# Altium PCB Layout.PcbDoc (part 1 of 2)
Units mm, origin at the board's own origin, x right, y up, seen from the top; angles counter-clockwise.
Board outline 72.5 x 55.5 mm, 4 copper layers (Top Layer, Ground Layer, Power Layer, Bottom Layer), stack 1.591 mm thick; 77 components, 40 nets, 247 pads, 203 vias.
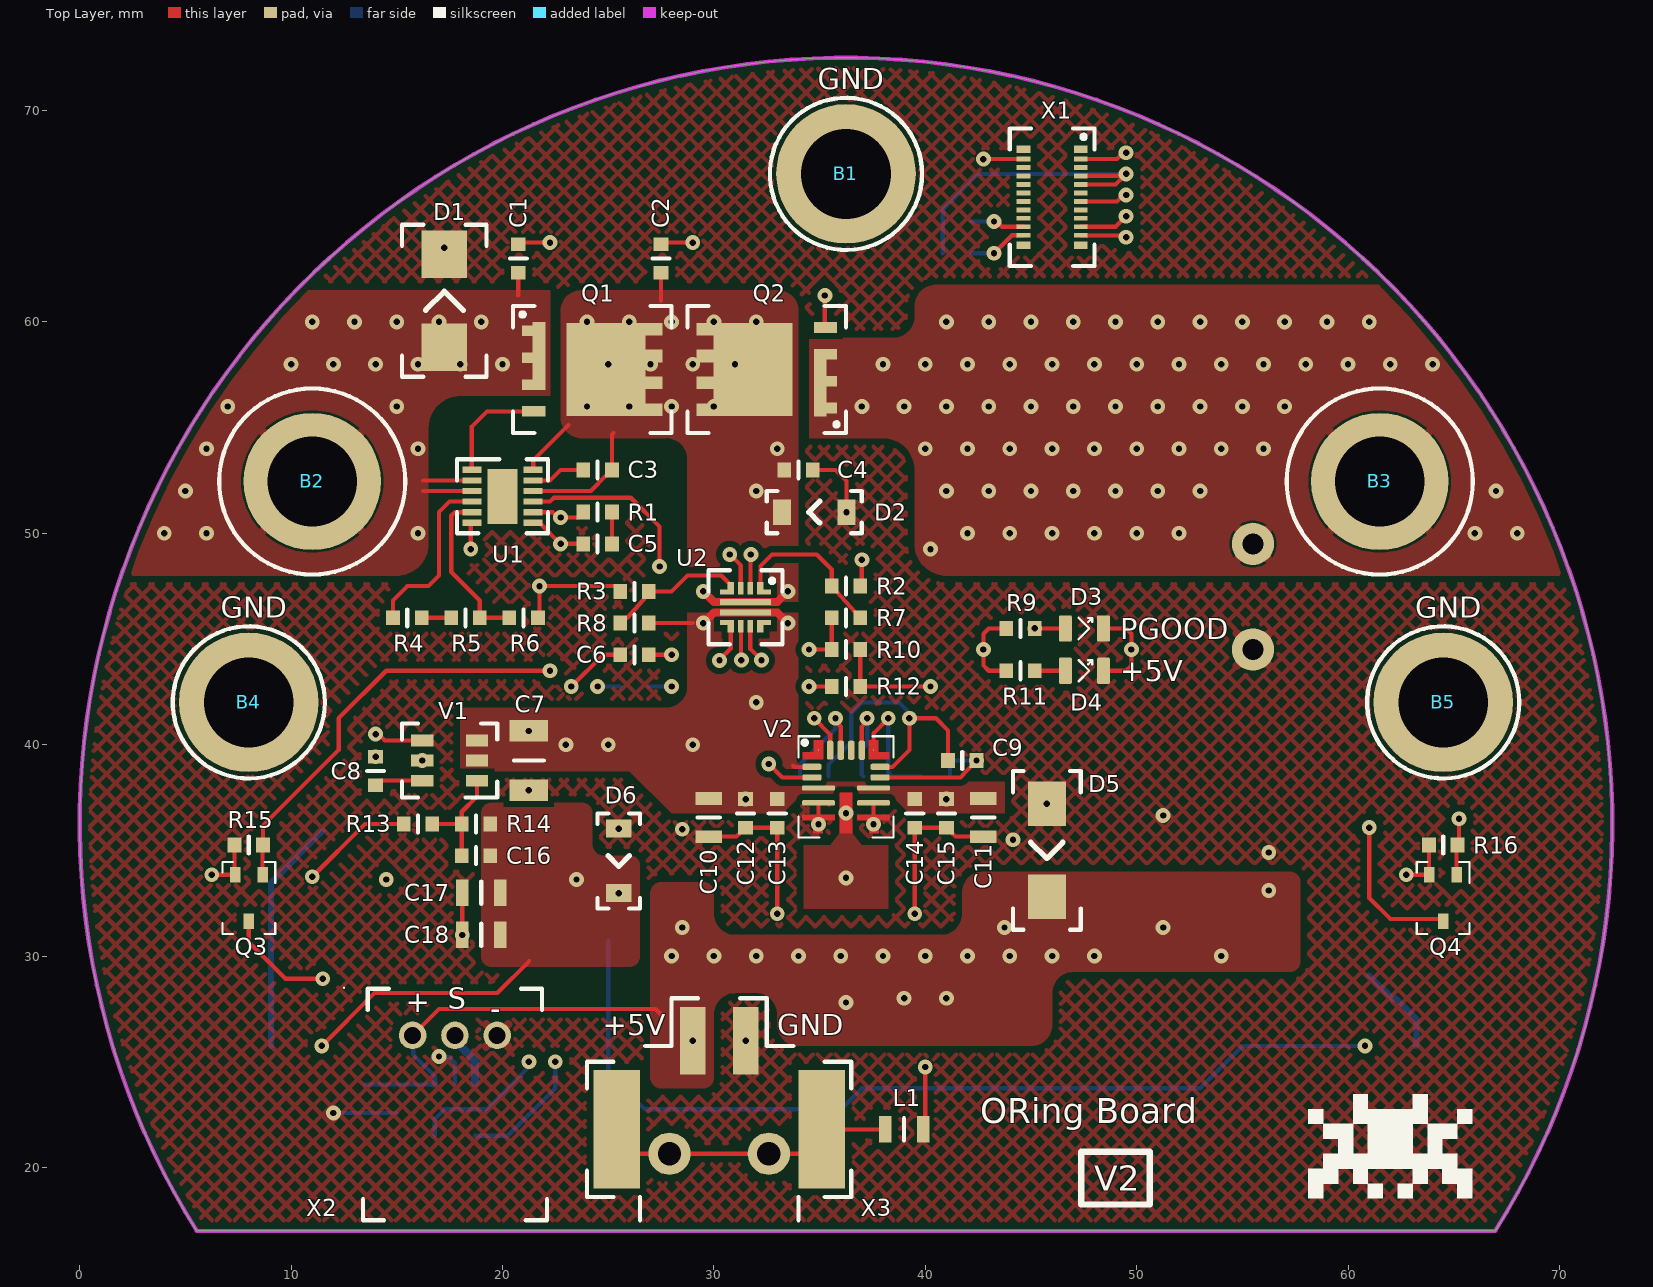
[diagram p0: Top Layer view]
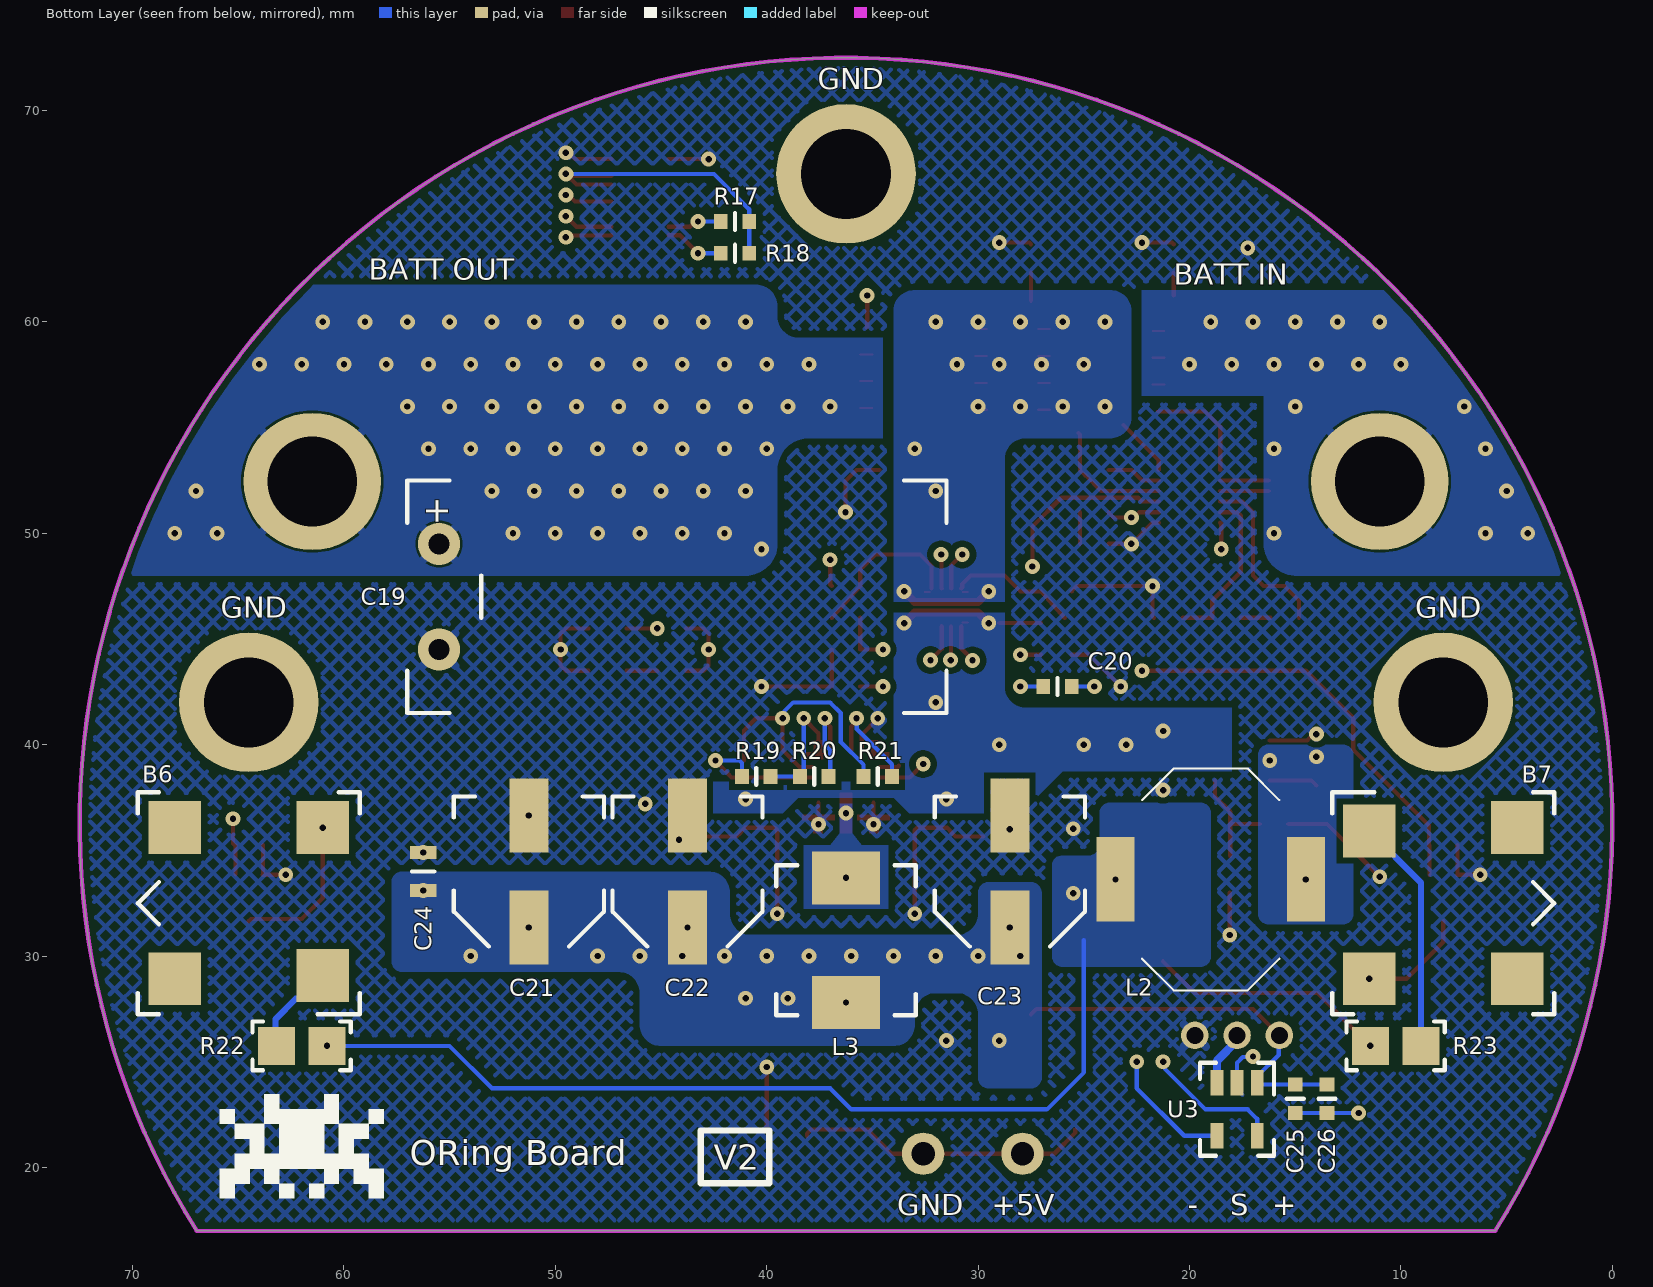
[diagram p1: Bottom Layer view, seen from below]
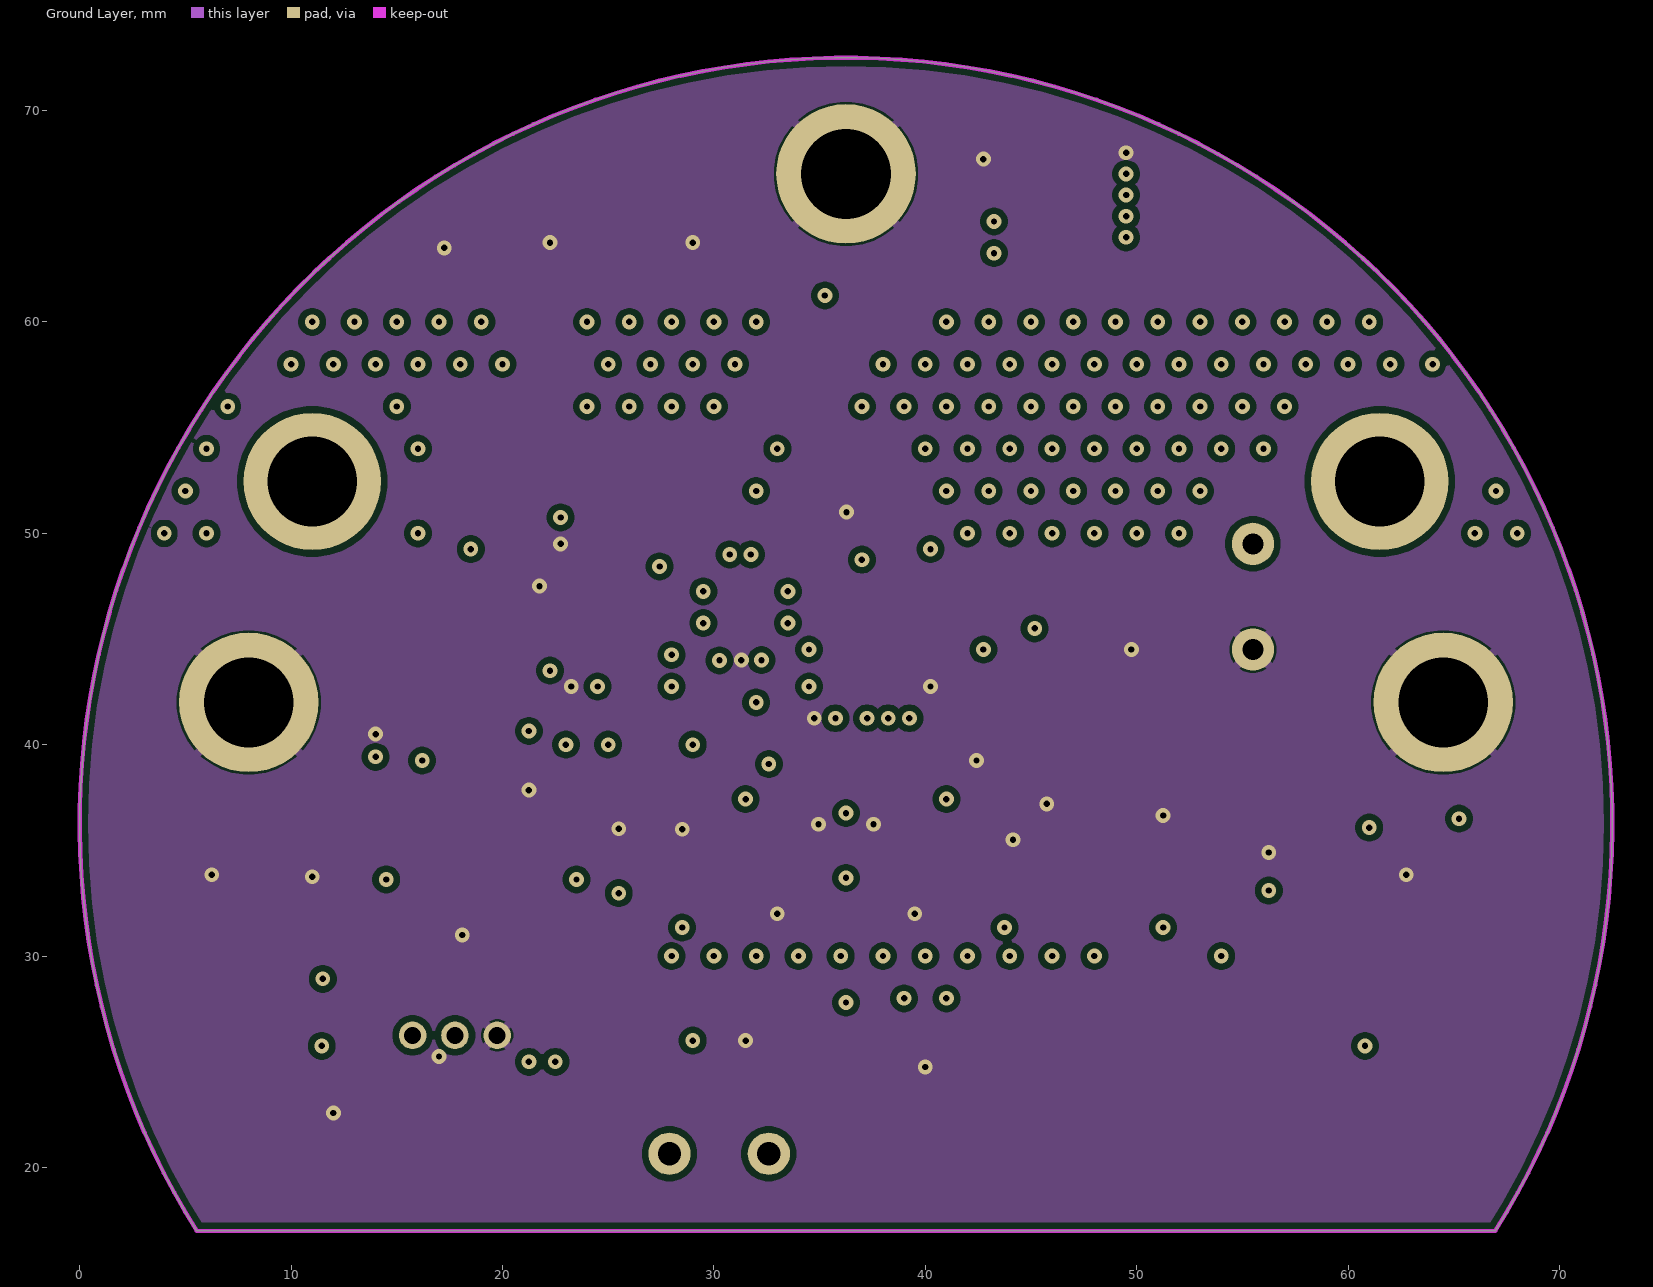
[diagram p2: Ground Layer]
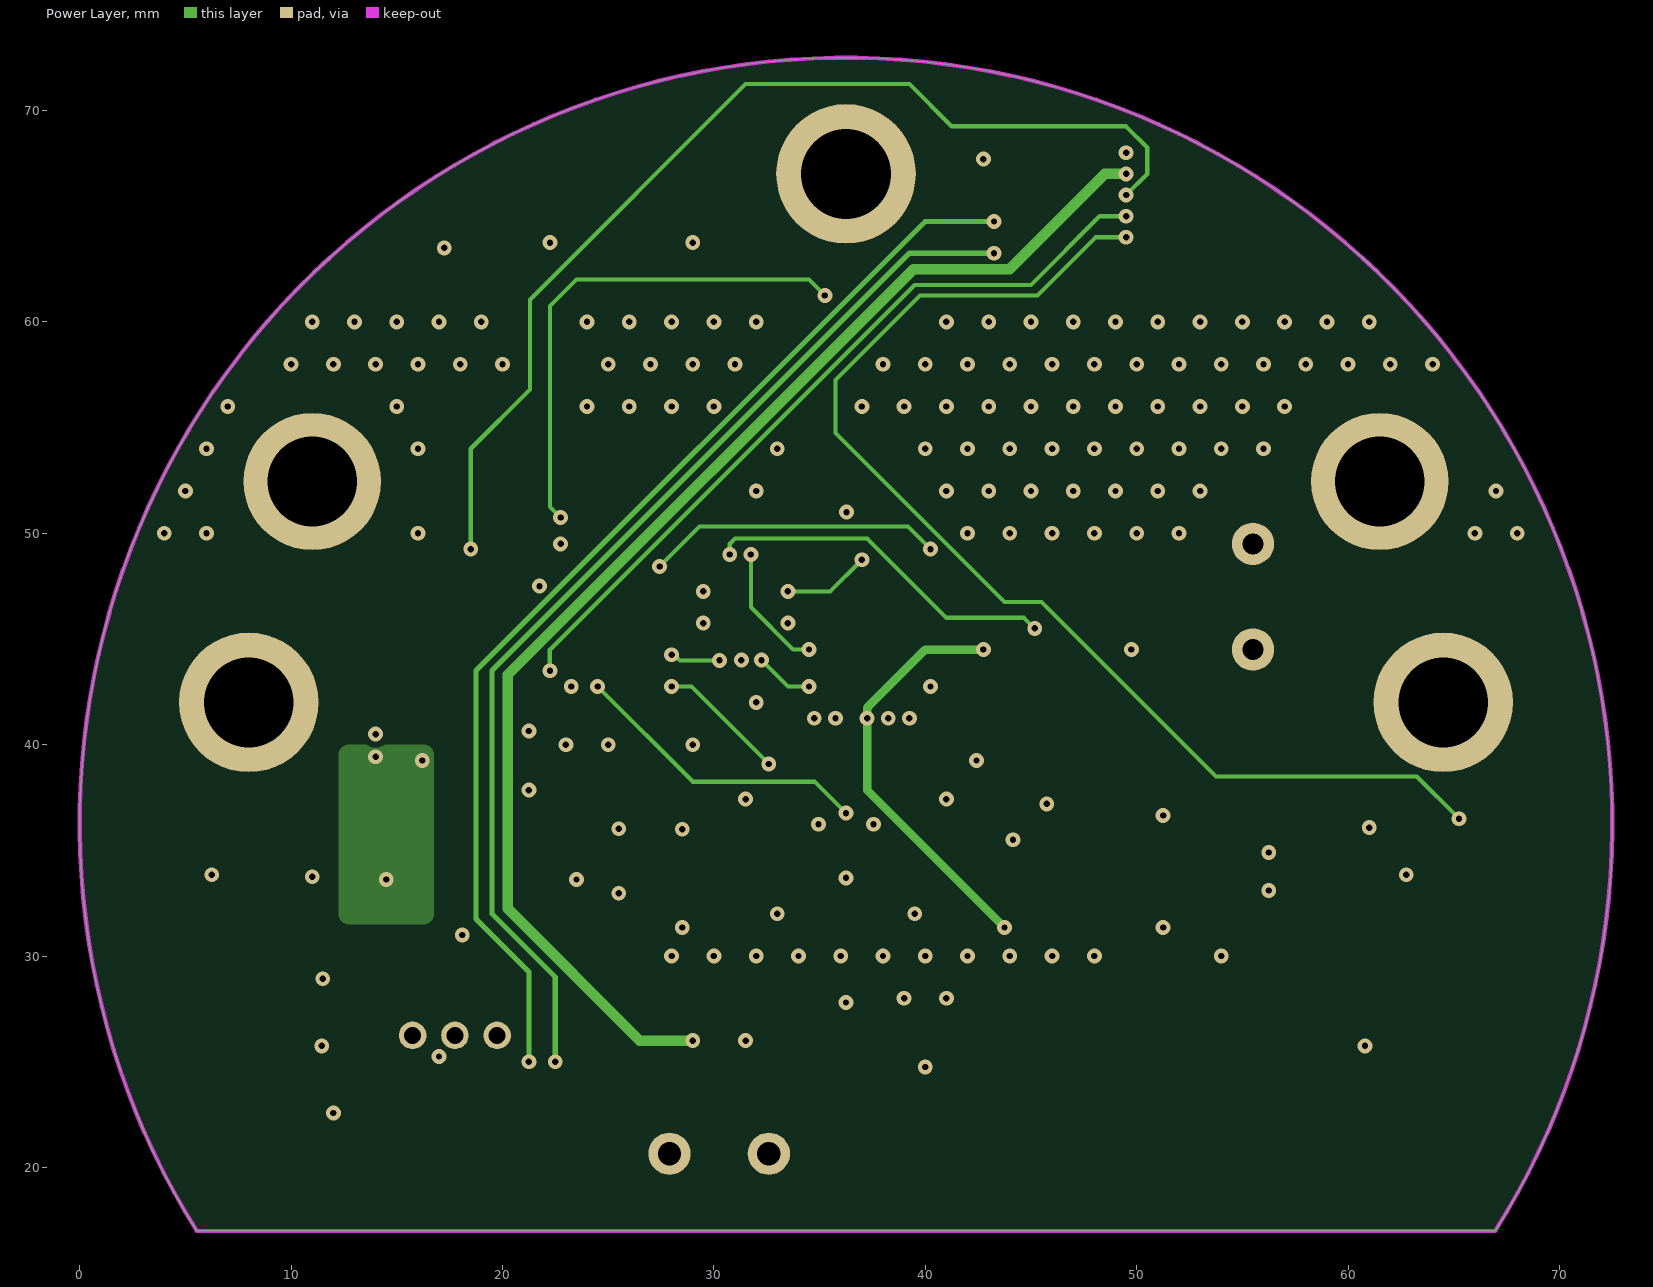
[diagram p3: Power Layer]

## Layer stack, top to bottom
Top Solder: solder mask 0.0102, Solder Resist, Dk 3.8
Top Layer: signal copper 0.035
Dielectric 2: prepreg 0.2104, 7628*1, Dk 4.4
Ground Layer: signal copper 0.0175
Dielectric 1: dielectric 1.065, FR-4, Dk 4.8
Power Layer: signal copper 0.0175
Dielectric 3: prepreg 0.2104, 7628*1, Dk 4.4
Bottom Layer: signal copper 0.035
Bottom Solder: solder mask 0.0102, Solder Resist, Dk 3.8

## Board outline
5.534,17 cw(c36.25,36.25) 66.966,17

## Design rules (kind name [scope] priority, off if disabled: settings)
BoardOutlineClearance [All] p1: gap=0.2 ignorepadtopadclearanceinfootprint=FALSE
Clearance "inPolygon Clearance" [InPolygon] p1: gap=0.3 ignorepadtopadclearanceinfootprint=TRUE // this rule ensures that every net within a polygon of a different net has a set clearance from the poly
Clearance "High Current Polygon Clearance" [(InPolygon AND InNetClass('High_Current_Nets'))] p2: gap=0 ignorepadtopadclearanceinfootprint=TRUE // this rule ensures that every net within a polygon of a different net has a set clearance from the poly
Clearance "Different Diff Pair" [All] p3: gap=0.2 ignorepadtopadclearanceinfootprint=TRUE
Clearance "Same Diff Pair" [All] p4: gap=0.1 ignorepadtopadclearanceinfootprint=TRUE
Clearance "Different Nets" [not InAnyDifferentialPair] p5: gap=0.3 ignorepadtopadclearanceinfootprint=TRUE except(0.1: Arc-SMDPad Arc-THPad Arc-Via Arc-Text Track-SMDPad Track-THPad Track-Via Track-Text SMDPad-Text THPad-Text Via-Text Fill-Text Poly-Text Region-Text Text-Text; 0.12: Arc-Arc Arc-Track Track-Track; 0.15: SMDPad-SMDPad SMDPad-THPad SMDPad-Via THPad-THPad THPad-Via Via-Via; 0.2: Arc-Hole Track-Hole SMDPad-Hole THPad-Hole Via-Hole Fill-Hole Poly-Hole Region-Hole Text-Hole)
Clearance "Same Net" [not InAnyDifferentialPair] p6: gap=0 ignorepadtopadclearanceinfootprint=TRUE except(0.1: THPad-Via; 0.18: Arc-Arc Arc-Track Track-Track)
ComponentClearance [All] p1: gap=0.102 collisioncheckmode=3 verticalgap=0.102 showdistances=TRUE
DiffPairsRouting "Ethernet Routing" [InDifferentialPairClass('Ethernet_Pairs')] p1: maxlimit=0.25 minlimit=0.2 mostfreqgap=0.25 toplayer_maxgap=0.2 toplayer_prefgap=0.2 toplayer_minwidth=0.25 toplayer_maxwidth=0.25 toplayer_prefwidth=0.25 midlayer1_mingap=0.25 midlayer1_minwidth=0.19 midlayer1_maxwidth=0.19 midlayer1_prefwidth=0.19 midlayer2_mingap=0.25 midlayer2_minwidth=0.19 midlayer2_maxwidth=0.19 midlayer2_prefwidth=0.19 bottomlayer_maxgap=0.2 bottomlayer_prefgap=0.2 bottomlayer_minwidth=0.25 bottomlayer_maxwidth=0.25 bottomlayer_prefwidth=0.25 impedanceprofiledriven=TRUE maxuncoupledlength=12.7
DiffPairsRouting "USB Routing" [InDifferentialPairClass('USB_Pairs')] p2: maxlimit=0.291 minlimit=0.127 mostfreqgap=0.291 toplayer_maxgap=0.127 toplayer_prefgap=0.127 toplayer_minwidth=0.23 toplayer_maxwidth=0.23 toplayer_prefwidth=0.23 midlayer1_mingap=0.291 midlayer1_minwidth=0.25 midlayer1_maxwidth=0.25 midlayer1_prefwidth=0.25 midlayer2_mingap=0.291 midlayer2_minwidth=0.25 midlayer2_maxwidth=0.25 midlayer2_prefwidth=0.25 bottomlayer_maxgap=0.127 bottomlayer_prefgap=0.127 bottomlayer_minwidth=0.23 bottomlayer_maxwidth=0.23 bottomlayer_prefwidth=0.23 maxuncoupledlength=12.7
DiffPairsRouting "CAN Routing" [InDifferentialPairClass('CAN_Pairs')] p3: maxlimit=0.907 minlimit=0.5 mostfreqgap=0.907 toplayer_maxgap=0.5 toplayer_prefgap=0.5 toplayer_minwidth=0.201 toplayer_maxwidth=0.201 toplayer_prefwidth=0.201 midlayer1_mingap=0.907 midlayer1_minwidth=0.155 midlayer1_maxwidth=0.155 midlayer1_prefwidth=0.155 midlayer2_mingap=0.907 midlayer2_minwidth=0.155 midlayer2_maxwidth=0.155 midlayer2_prefwidth=0.155 bottomlayer_maxgap=0.5 bottomlayer_prefgap=0.5 bottomlayer_minwidth=0.201 bottomlayer_maxwidth=0.201 bottomlayer_prefwidth=0.201 impedanceprofiledriven=TRUE maxuncoupledlength=12.7
Height [All] p1: minheight=0 maxheight=1816.048 prefheight=12.7
HoleSize [All] p1: absolutevalues=TRUE maxlimit=6.3 minlimit=0.3 maxpercent=80.000 minpercent=20.000
HoleToHoleClearance [All] p1: gap=0.25 allowstackedmicrovias=FALSE
MatchedLengths "XTAL Nets Matched Delays" [InNetClass('XTAL_Nets')] p1: tolerance=25.4 checknetsindiffpair=FALSE checkdiffpairvsdiffpair=TRUE checkxsignals=TRUE checkothers=TRUE usedelayunits=TRUE delaytolerance=10.000000
MatchedLengths "Diff Pair Matched Delays" [InDifferentialPairClass('Ethernet_Pairs') or InDifferentialPairClass('USB_Pairs') or InDifferentialPairClass('CAN_Pairs')] p2: tolerance=5 checknetsindiffpair=TRUE checkdiffpairvsdiffpair=FALSE checkxsignals=FALSE checkothers=FALSE usedelayunits=TRUE delaytolerance=100.000000 phasematching=TRUE phasedelaytolerance=5.000000 phasedistance=12.7
MinimumAnnularRing [All] p1: minimumring=0.2
MinimumSolderMaskSliver [All] p1: minsoldermaskwidth=0
PlaneClearance "Supply Net Clearance" [InNetClass('Supply_Nets')] p1: clearance=0.5
PlaneClearance "All Nets" [All] p2: clearance=0.3
PolygonConnect "High Current" [InNetClass('High_Current_Nets')] p1: thpad.connectstyle=Relief thpad.reliefconductorwidth=0.4 thpad.reliefentries=4 thpad.polygonreliefangle="90 Angle" thpad.airgapwidth=0.1 thpad.conductorbypadedge=TRUE thpad.mindistance=0.381 thpad.enablemindistance=FALSE smdpad.connectstyle=Direct smdpad.reliefconductorwidth=0.254 smdpad.reliefentries=4 smdpad.polygonreliefangle="90 Angle" smdpad.airgapwidth=0.254 via.connectstyle=Direct via.reliefconductorwidth=0.254 via.reliefentries=4 via.polygonreliefangle="90 Angle" via.airgapwidth=0.254
PolygonConnect "Supply Nets" [InNetClass('Supply_Nets') OR InNetClass('Supply_Net')] p2: connectstyle=Relief reliefconductorwidth=0.3 reliefentries=4 polygonreliefangle="90 Angle" conductorbypadedge=TRUE mindistance=0.381 enablemindistance=FALSE airgapwidth=0.254
PolygonConnect General [All] p3: connectstyle=Relief reliefconductorwidth=0.254 reliefentries=4 polygonreliefangle="90 Angle" airgapwidth=0.254
RoutingVias [All] p1: holewidth=0.2 width=0.35 viastyle="Through Hole" minholewidth=0.15 minwidth=0.3 maxholewidth=6.3 maxwidth=6.55
SilkToSilkClearance [All] p1: silktosilkclearance=0
SilkToSolderMaskClearance [All] p1: minsilkscreentomaskgap=0 clearancetoexposedcopper=TRUE
SolderMaskExpansion [All] p1: expansion=0.075 istentingtop=FALSE
SupplyNets "Schematic Supply Nets_6" [InNet('GND')] p1: voltage=0.000
SupplyNets "Schematic Supply Nets_3" [InNet('Earth')] p2: voltage=0.000
SupplyNets "Schematic Supply Nets_1" [InNet('+5V')] p3: voltage=0.000
SupplyNets "Schematic Supply Nets_4" [InNet('+12V')] p4: voltage=0.000
SupplyNets "Schematic Supply Nets" [InNet('BATT Switched')] p5: voltage=0.000
SupplyNets "Schematic Supply Nets_2" [InNet('BATTERY IN')] p6: voltage=0.000
UnRoutedNet [All] p1: checkbadconnections=TRUE
Width "nRF Width" [InNetClass('nRF Signal')] p1: maxlimit=0.379 minlimit=0.263 preferedwidth=0.379 toplayer_minwidth=0.379 midlayer1_maxwidth=0.263 midlayer1_prefwidth=0.263 midlayer2_maxwidth=0.263 midlayer2_prefwidth=0.263 bottomlayer_minwidth=0.379 minimp=50.000000 maximp=50.000000 favimp=50.000000 checkconnectedcopper=TRUE
Width [All] p2: maxlimit=100 minlimit=0.1 preferedwidth=0.2
20 further rules are at their usual default settings.

## Classes and differential pairs
component class "Inrush Current Limiter": C4 C6 D2 D3 R2 R3 R7 R8 R9 R10 R12 U2
component class "Current Sensor ADC": C25 C26 R17 R18 U3
component class Buzzers: B6 B7 Q3 Q4 R15 R16 R22 R23
net class High_Current_Nets: +5V +12V "+12V Reg SW" "BATT Switched" BATT_always_on "BATTERY IN" CAP DGATE GND HGATE NetC5_2 NetC20_2 VREG_IN
component class Power: C7 C8 C9 C10 C11 C12 C13 C14 C15 C16 C17 C18 C20 C21 C22 C23 C24 D4 D5 D6 L1 L2 L3 R11 R13 R14 R19 R20 R21 V1 V2
component class "ORing Controller": C1 C2 C3 C5 C19 D1 Q1 Q2 R1 R4 R5 R6 U1
component class Connectors: B1 B2 B3 B4 B5 X1 X2 X3

## Components (designator, comment, footprint, x,y, rotation, side; value= is the part's Value field where it differs from the comment)
B1 "M4 4mm Spacer" "[Bolt] M4 len=4mm OD=6mm Spacer" 36.25,67 r0 top (schematic designator B3)
B2 "M4 16mm" "[Bolt] M4 16mm Button Head Hex Bolt" 11,52.45 r0 top
B3 "M4 16mm" "[Bolt] M4 16mm Button Head Hex Bolt" 61.5,52.45 r0 top (schematic designator B4)
B4 "M4 4mm Spacer" "[Bolt] M4 len=4mm OD=6mm Spacer" 8,42 r0 top (schematic designator B1)
B5 "M4 4mm Spacer" "[Bolt] M4 len=4mm OD=6mm Spacer" 64.5,42 r0 top
B6 "Passive buzzer" "[Buzzer] Passive SMD 12V 80mA" 64.5,32.5 r0 bottom (schematic designator B7)
B7 "Passive buzzer" "[Buzzer] Passive SMD 12V 80mA" 8,32.5 r180 bottom (schematic designator B6)
C1 "[Cap] 0603 0.1uF 10% 50V" "[Cap] SMD 0603" 20.75,63 r270 top
C2 "[Cap] 0603 0.1uF 10% 50V" "[Cap] SMD 0603" 27.5,63 r270 top (schematic designator C3)
C3 "[Cap] 0603 0.1uF 10% 50V" "[Cap] SMD 0603" 24.5,53 r0 top (schematic designator C2)
C4 "[Cap] 0603 10uF 20% 16V" "[Cap] SMD 0603" 34,53 r180 top (schematic designator C28)
C5 "[Cap] 0603 0.01uF 10% 50V" "[Cap] SMD 0603" 24.5,49.5 r0 top
C6 "[Cap] 0603 6200pF 5% 50V" "[Cap] SMD 0603" 26.25,44.25 r0 top (schematic designator C27)
C7 "[Cap] 1206 10uF 20% 50V" "[Cap] SMD 1206" 21.25,39.25 r90 top (schematic designator C22)
C8 "[Cap] 0603 0.1uF 10% 50V" "[Cap] SMD 0603" 14,38.75 r270 top (schematic designator C18)
C9 "[Cap] 0603 2.2uF 10% 25V" "[Cap] SMD 0603" 41.75,39.25 r180 top (schematic designator C17)
C10 "[Cap] 0805 22uF 20% 25V" "[Cap] SMD 0805" 29.75,36.55 r90 top
C11 "[Cap] 0805 22uF 20% 25V" "[Cap] SMD 0805" 42.75,36.55 r90 top
C12 "[Cap] 0603 0.1uF 10% 50V" "[Cap] SMD 0603" 31.5,36.75 r90 top (schematic designator C6)
C13 "[Cap] 0603 4.7uF 10% 25V" "[Cap] SMD 0603" 33,36.75 r90 top (schematic designator C8)
C14 "[Cap] 0603 4.7uF 10% 25V" "[Cap] SMD 0603" 39.5,36.75 r90 top (schematic designator C9)
C15 "[Cap] 0603 0.1uF 10% 50V" "[Cap] SMD 0603" 41,36.75 r90 top (schematic designator C7)
C16 "[Cap] 0603 12pF 5% 50V" "[Cap] SMD 0603" 18.75,34.75 r0 top (schematic designator C19)
C17 "[Cap] 0805 22uF 20% 25V" "[Cap] SMD 0805" 19,33 r0 top (schematic designator C20)
C18 "[Cap] 0805 22uF 20% 25V" "[Cap] SMD 0805" 19,31 r0 top (schematic designator C21)
C19 "[Cap] Thru-Hole 1000uF 20% 35V" "[Cap] Thru-Hole Right-Angle Polarized 10mm" 55.5,47 r270 bottom locked (schematic designator C4)
C20 "[Cap] 0603 0.1uF 10% 50V" "[Cap] SMD 0603" 26.25,42.75 r180 bottom (schematic designator C12)
C21 "[Cap] 6.3mm 47uF 20% 35V" "[Cap] SMD Polarized, 6.3mm" 51.25,34 r90 bottom (schematic designator C13)
C22 "[Cap] 6.3mm 47uF 20% 35V" "[Cap] SMD Polarized, 6.3mm" 43.75,34 r90 bottom (schematic designator C14)
C23 "[Cap] 6.3mm 47uF 20% 35V" "[Cap] SMD Polarized, 6.3mm" 28.5,34 r90 bottom (schematic designator C15)
C24 "[Cap] 0805 22uF 20% 25V" "[Cap] SMD 0805" 56.25,34 r270 bottom (schematic designator C16)
C25 "[Cap] 0603 0.1uF 10% 50V" "[Cap] SMD 0603" 15,23.25 r90 bottom (schematic designator C23)
C26 "[Cap] 0603 10uF 20% 16V" "[Cap] SMD 0603" 13.5,23.25 r90 bottom (schematic designator C24)
D1 "DO-214AA" "[Diode] SMD DO-214AA" 17.25,61 r90 top
D2 "SZSMF4L17CAT3G" "[Diode] SOD-123F" 34.75,51 r180 top (schematic designator D5)
D3 "[LED] SMD 0805 Green" "[LED] SMD 0805" 47.53,45.496 r0 top (schematic designator D4)
D4 "[LED] SMD 0805 Yellow" "[LED] SMD 0805" 47.53,43.496 r0 top (schematic designator D6)
D5 "DO-214AC" "[Diode] SMD DO-214AC" 45.75,35 r270 top (schematic designator D3)
D6 "SOD-123F" "[Diode] SOD-123F" 25.5,34.5 r270 top (schematic designator D2)
L1 "652-MH2029-300Y" "[Ferrite] SMD 0805" 39,21.8 r0 top (schematic designator L2)
L2 "[10uH] SMD Nonstandard 3.8A" "[10uH] SMD Nonstandard 3.8A" 19,33.625 r0 bottom (schematic designator L3)
L3 "[2.2uH] SMD Nonstandard 10A" "[Inductor] SMD 7.4 X 6.6 X 3 MM" 36.25,30.75 r270 bottom (schematic designator L1)
Q1 "[NMOS] SMD 40V 175A 0.55mOhm" "[NMOS] SMD 40V 175A 0.55mOhm"#1 24.25,57.75 r270 top
Q2 "[NMOS] SMD 40V 175A 0.55mOhm" "[NMOS] SMD 40V 175A 0.55mOhm"#2 32.5,57.75 r90 top
Q3 "[NMOS] SMD 20V 1.4A 160mOhm" SOT323 8,32.75 r270 top
Q4 "[NMOS] SMD 20V 1.4A 160mOhm" SOT323 64.5,32.75 r270 top
R1 "[100] SMD 0603 1% 1/10W" "[Res] SMD 0603" 24.5,51 r0 top
R2 "[470k] SMD 0603 1% 1/10W" "[Res] SMD 0603" 36.25,47.5 r0 top (schematic designator R16)
R3 "[11.8k] SMD 0603 1% 1/10W" "[Res] SMD 0603" 26.25,47.25 r0 top (schematic designator R22)
R4 "[90.9k] SMD 0603 1% 1/10W" "[Res] SMD 0603" 15.5,46 r180 top (schematic designator R2)
R5 "[9.09k] SMD 0603 1% 1/10W" "[Res] SMD 0603" 18.25,46 r180 top (schematic designator R3)
R6 "[3.48k] SMD 0603 1% 1/10W_1" "[Res] SMD 0603" 21,46 r0 top (schematic designator R4)
R7 "[8.2k] SMD 0603 1% 1/10W" "[Res] SMD 0603" 36.25,46 r0 top (schematic designator R17)
R8 "[100k] SMD 0603 1% 1/10W" "[Res] SMD 0603" 26.25,45.75 r0 top (schematic designator R19)
R9 "[100k] SMD 0603 1% 1/10W" "[Res] SMD 0603" 44.5,45.5 r180 top (schematic designator R20)
R10 "[34.8k] SMD 0603 1% 1/10W" "[Res] SMD 0603" 36.25,44.5 r180 top (schematic designator R18)
R11 "[220] SMD 0603 5% 1/10W" "[Res] SMD 0603" 44.5,43.5 r0 top (schematic designator R23)
R12 "[562] SMD 0603 1% 1/10W" "[Res] SMD 0603" 36.25,42.75 r180 top (schematic designator R21)
R13 "[30.1k] SMD 0603 1% 1/10W" "[Res] SMD 0603" 16,36.25 r0 top (schematic designator R9)
R14 "[422k] SMD 0603 1% 1/10W" "[Res] SMD 0603" 18.75,36.25 r0 top (schematic designator R8)
R15 "[1M] SMD 0603 1% 1/10W" "[Res] SMD 0603" 8,35.25 r0 top (schematic designator R12)
R16 "[1M] SMD 0603 1% 1/10W" "[Res] SMD 0603" 64.5,35.25 r0 top (schematic designator R13)
R17 "[1k] SMD 0603 1% 1/10W" "[Res] SMD 0603" 41.5,64.75 r180 bottom (schematic designator R15)
R18 "[1k] SMD 0603 1% 1/10W" "[Res] SMD 0603" 41.5,63.25 r180 bottom (schematic designator R14)
R19 "[10k] SMD 0603 1% 1/8W" "[Res] SMD 0603" 40.5,38.5 r180 bottom (schematic designator R7)
R20 "[52.3k] SMD 0603 1% 1/10W" "[Res] SMD 0603" 37.75,38.5 r180 bottom (schematic designator R5)
R21 "[1k] SMD 0603 1% 1/10W" "[Res] SMD 0603" 34.75,38.5 r180 bottom (schematic designator R6)
R22 "[100] SMD 1206 0.5% 1W" "[Res] SMD 1206" 62,25.75 r180 bottom (schematic designator R11)
R23 "[100] SMD 1206 0.5% 1W" "[Res] SMD 1206" 10.25,25.75 r0 bottom (schematic designator R10)
U1 "[ORing] Back-to-Back External NMOS Controller" "[ORing] Back-to-Back External NMOS Controller" 20,51.75 r0 top
U2 "TPS259460ARPWR" "10-VQFN-HR (2x2)" 31.5,46.5 r270 top (schematic designator U3)
U3 "[ADC] 2.7-5.5V 12bit Single-Ended" "[ADC] 2.7-5.5V 12bit Single-Ended" 17.75,22.75 r270 bottom (schematic designator U2)
V1 "SOT-23" SOT-23 17.5,39.25 r180 top (schematic designator V2)
V2 "[Switching] SMD 0.8-10V 8A" "[Switching] 17-PowerWFQFN" 36.25,38 r0 top (schematic designator V1)
X1 "[Mezzanine] 20pin 0.4mm Female" "[Mezzanine] 20pin 0.4mm Female" 46,65.9 r270 top
X2 "[Sherlock] 3pin 90deg" "[Sherlock] 3pin 90deg" 17.75,26.25 r180 top
X3 "[Pheonix] 2pin 2.5mm pitch" "[Pheonix] 2pin 2.5mm pitch" 30.25,26 r0 top

## Footprints (in the part's own frame and the unit in brackets; to place one, negate y for a bottom-side part, rotate by r counter-clockwise, add the part's x,y. Pads: shape width x height; smd on the part's side, far side on the other; paste and mask are expansions set on the pad)
"10-VQFN-HR (2x2)" [mm]
  rect 0.6x0.3 smd: 1(-0.9,0.7) 4(-0.9,-0.7) 7(0.9,-0.7) 10(0.9,0.7)
  rect 0.25x0.35 smd: 1(-0.725,1.025) 4(-0.725,-1.025) 7(0.725,-1.025) 10(0.725,1.025)
  rect 0.6x0.25 smd: 2(-0.9,0.225) 3(-0.9,-0.225) 8(0.9,-0.225) 9(0.9,0.225)
  rect 0.3x2.4 smd: 5(-0.25,0) 6(0.25,0)
  silkscreen extent -1.75,-1.75 1.75,1.75, body extent -1,-1 1,1, height 1
"[10uH] SMD Nonstandard 3.8A" [mm] "SRU1038-100Y"
  rect 1.8x4 smd: 1(-4.5,0) 2(4.5,0)
  silkscreen extent -3.25,-5.25 3.25,5.25, body extent -5,-5 5,5, height 3.85
"[ADC] 2.7-5.5V 12bit Single-Ended" [mm] "MCP3221A0T-E/OT"
  rect 1.2x0.6 smd: 1(-1.25,0.95) 2(-1.25,0) 3(-1.25,-0.95) 4(1.25,-0.95) 5(1.25,0.95)
  silkscreen extent -2.2,-1.75 2.2,1.75, body extent -1.4,-1.45 1.4,1.45, height 1.2
"[Bolt] M4 16mm Button Head Hex Bolt" [mm]
  round 6.5 hole 4.25: 1(0,0)
  silkscreen extent -4.4,-4.4 4.4,4.4, body extent -3.8,-3.8 3.8,3.8, height 2.2
"[Bolt] M4 len=4mm OD=6mm Spacer" [mm]
  round 6.6 hole 4.25: 1(0,0)
  silkscreen extent -3.6,-3.6 3.6,3.6, body extent -3,-3 3,3, height 4
"[Buzzer] Passive SMD 12V 80mA" [mm] "CT08E-16S400-2"
  rect 2.5x2.5 smd: 1(-3.5,3.424) 2(-3.5,-3.576) MP(3.5,-3.576) MP(3.5,3.576)
  silkscreen extent -5.25,-5.25 5.25,5.25, body extent -4.25,-4.25 4.25,4.25, height 4
"[Cap] SMD 0603" [mm]
  rect 0.65x0.7 smd: 1(-0.675,0) 2(0.675,0)
  silkscreen extent 0,-0.4 0,0.4, body extent -0.8,-0.45 0.8,0.45, height 0.8
"[Cap] SMD 0805" [mm]
  rect 0.6x1.25 smd: 1(-0.9,0) 2(0.9,0)
  silkscreen extent 0,-0.53 0,0.53, body extent -1,-0.63 1,0.63, height 1
"[Cap] SMD 1206" [mm]
  rect 1.02x1.82 smd: 1(-1.4,0) 2(1.4,0)
  silkscreen extent 0,-0.7 0,0.7, body extent -1.7,-0.9 1.7,0.9, height 1.8
"[Cap] SMD Polarized, 6.3mm" [mm]
  rect 3.5x1.85 smd: 1(-2.65,0) 2(2.65,0)
  silkscreen extent -3.55,-3.55 3.55,3.55, body extent -3.7,-3.4 3.7,3.4, height 6.1
"[Cap] Thru-Hole Right-Angle Polarized 10mm" [mm]
  round 2 hole 1: 1(-2.5,0) 2(2.5,0)
  silkscreen extent -5.5,-1.5 5.5,24, body extent -5,-0.3 5,23.5, height 9.99
"[Diode] SMD DO-214AA" [mm]
  rect 2.25x2.15 smd: 1(2.2,0) 2(-2.2,0)
  silkscreen extent -3.6,-2 3.6,2, body extent -2.68,-1.75 2.68,1.75, height 2.3
"[Diode] SMD DO-214AC" [mm]
  rect 2.1x1.8 smd: 1(2.2,0) 2(-2.2,0)
  silkscreen extent -3.75,-1.6 3.75,1.6, body extent -3.07,-1.33 3.07,1.33, height 2.39
"[Diode] SOD-123F" [mm]
  rect 0.85x1.2 smd: 1(1.525,0) 2(-1.525,0)
  silkscreen extent -2.25,-1 2.25,1, body extent -1.75,-0.8 1.75,0.8, height 0.8
"[Ferrite] SMD 0805" [mm]
  rect 0.6x1.25 smd: 1(-0.9,0) 2(0.9,0)
  silkscreen extent 0,-0.53 0,0.53, body extent -1,-0.6 1,0.6, height 1.1
"[Inductor] SMD 7.4 X 6.6 X 3 MM" [mm]
  rect 2.5x3.2 smd: 1(-2.95,0) 2(2.95,0)
  silkscreen extent -3.55,-3.3 3.55,3.3, body extent -3.55,-3.3 3.55,3.3, height 3
"[LED] SMD 0805" [mm]
  rrect20% 0.6x1.25 smd: 1(-0.9,0) 2(0.9,0)
  silkscreen extent -0.28,-0.51 0.37,0.51, body extent -1,-0.65 1,0.65, height 0.8
"[Mezzanine] 20pin 0.4mm Female" [mm] "DF40C-20DP-0.4V(51)"
  rect 0.23x0.66 smd paste+0 mask+0.102: 1(-1.8,1.355) 2(-1.8,-1.355) 3(-1.4,1.355) 4(-1.4,-1.355) 5(-1,1.355) 6(-1,-1.355) 7(-0.6,1.355) 8(-0.6,-1.355) 9(-0.2,1.355) 10(-0.2,-1.355) 11(0.2,1.355) 12(0.2,-1.355) 13(0.6,1.355) 14(0.6,-1.355) 15(1,1.355) 16(1,-1.355) 17(1.4,1.355) 18(1.4,-1.355) 19(1.8,1.355) 20(1.8,-1.355)
  rect 0.35x0.66 smd paste+0 mask+0.102: MP(-2.275,1.355) MP(-2.275,-1.355) MP(2.275,1.355) MP(2.275,-1.355)
  silkscreen extent -3.25,-2 3.25,2, body extent -2.76,-1.48 2.76,1.49, height 1.14
"[NMOS] SMD 40V 175A 0.55mOhm"#1 [mm] "IAUCN04S7N005ATMA1"
  rect 0.5x0.5 smd: 1(-1.825,-3.075) 1(-0.555,-3.075) 1(0.715,-3.075)
  rect 3.2x0.6 smd: 1(-0.635,-2.525)
  rect 0.5x1.1 smd: 2(1.985,-2.775)
  rect 0.6x0.8 smd: 3(-1.905,2.925) 3(-0.635,2.925) 3(0.635,2.925) 3(1.905,2.925)
  rect 4.41x3.75 smd: 3(0,0.65)
  Top Layer lines w0.1: 0.715,-3.075 0.715,-2.525 0.715,-2.495 ; -0.555,-3.075 -0.555,-2.525 -0.555,-2.495 ; -1.825,-3.075 -1.825,-2.525 -1.825,-2.495 ; 1.905,2.345 1.905,2.925 ; 0.635,2.345 0.635,2.925 ; -0.635,2.345 -0.635,2.75 -0.635,2.925 ; -1.905,2.345 -1.905,2.925
  silkscreen extent -3,-3.75 3,3.75, body extent -2.71,-3.22 2.71,3.22, height 1
"[NMOS] SMD 40V 175A 0.55mOhm"#2 [mm] "IAUCN04S7N005ATMA1"
  rect 0.5x0.5 smd: 1(-1.825,-3.075) 1(-0.555,-3.075) 1(0.715,-3.075)
  rect 3.2x0.6 smd: 1(-0.635,-2.525)
  rect 0.5x1.1 smd: 2(1.985,-2.775)
  rect 0.6x0.8 smd: 3(-1.905,2.925) 3(-0.635,2.925) 3(0.635,2.925) 3(1.905,2.925)
  rect 4.41x3.75 smd: 3(0,0.65)
  Top Layer lines w0.1: -1.905,2.925 -1.905,2.5 -1.905,2.345 ; -0.635,2.925 -0.635,2.345 ; 0.635,2.925 0.635,2.345 ; 1.905,2.925 1.905,2.5 1.905,2.345 ; -1.825,-2.495 -1.825,-2.525 -1.825,-3.075 ; -0.555,-2.495 -0.555,-2.525 -0.555,-3.075 ; 0.715,-2.495 0.715,-2.525 0.715,-3.075
  silkscreen extent -3,-3.75 3,3.75, body extent -2.71,-3.22 2.71,3.22, height 1
"[ORing] Back-to-Back External NMOS Controller" [mm] "LM74810QDRRRQ1"
  rect 0.9x0.3 smd: 1(-1.45,1.25) 2(-1.45,0.75) 3(-1.45,0.25) 4(-1.45,-0.25) 5(-1.45,-0.75) 6(-1.45,-1.25) 7(1.45,-1.25) 8(1.45,-0.75) 9(1.45,-0.25) 10(1.45,0.25) 11(1.45,0.75) 12(1.45,1.25)
  rect 1.4x2.6 smd: 13(0,0)
  silkscreen extent -2.15,-1.75 2.15,1.75, body extent -1.5,-1.5 1.5,1.5, height 0.8
"[Pheonix] 2pin 2.5mm pitch" [mm] "1778764"
  rect 1.2x3.2 smd: 1(-1.25,0) 2(1.25,0)
  rect 2.2x5.6 smd: MP(-4.85,-4.2) MP(4.85,-4.2)
  round 2 hole 1.1: MP(-2.35,-5.35) MP(2.35,-5.35)
  silkscreen extent -6.25,-8.5 6.25,2, body extent -5.3,-8.18 5.3,1.32, height 5
"[Res] SMD 0603" [mm]
  rect 0.65x0.7 smd: 1(-0.675,0) 2(0.675,0)
  silkscreen extent 0,-0.4 0,0.4, body extent -0.8,-0.45 0.8,0.45, height 0.8
"[Res] SMD 1206" [mm]
  rect 1.75x1.8 smd: 1(-1.2,0) 2(1.2,0)
  silkscreen extent -2.32,-1.15 2.32,1.15, body extent -1.6,-0.8 1.6,0.8, height 0.55
"[Sherlock] 3pin 90deg" [mm] "0353630360"
  round 1.3 hole 0.8: 1(2,0) 2(0,0) 3(-2,0)
  silkscreen extent -4.35,-2.2 4.35,8.75, body extent -4.85,-1.98 4.85,8.52, height 5.43
"[Switching] 17-PowerWFQFN" [mm]
  rrect50% 0.9x0.3 smd: 1(-1.612,0.95) 2(-1.612,0.45) 10(1.612,0.45) 11(1.612,0.95)
  rrect50% 1.55x0.25 smd: 3(-1.299,-0.05) 4(-1.299,-0.75) 8(1.3,-0.75) 9(1.3,-0.05)
  round 0.025 smd: 5(-1.3,-1.763) 6(0,-1.238) 7(1.3,-1.763) 12(1.3,1.75) 12(1.787,1.475) 17(-1.788,1.475) 17(-1.3,1.75)
  rect 0.127x0.127 smd paste-0.064 mask-0.064: 10(1.612,0.45) 11(1.612,0.95)
  rrect50% 0.3x0.9 smd: 13(0.75,1.736) 14(0.25,1.736) 15(-0.25,1.737) 16(-0.75,1.737)
  Top Layer region: -0.3,-0.275 0.3,-0.275 0.3,-2.2 -0.3,-2.2
  Top Layer region: -1.1,-1.575 -0.525,-1.575 -0.525,-1.325 -2.075,-1.325 -2.075,-1.575 -1.55,-1.575 -1.55,-2.2 -1.1,-2.2
  Top Layer region: 1.1,-1.575 0.525,-1.575 0.525,-1.325 2.075,-1.325 2.075,-1.575 1.55,-1.575 1.55,-2.2 1.1,-2.2
  Top Layer region: -1.525,1.65 -1.525,1.3 -1.075,1.3 -1.075,2.2 -1.525,2.2
  Top Layer region: -2.05,1.65 -1.525,1.65 -1.525,1.3 -2.05,1.3
  Top Layer region: 1.525,1.65 1.525,1.3 1.075,1.3 1.075,2.2 1.525,2.2
  Top Layer region: 2.05,1.65 1.525,1.65 1.525,1.3 2.05,1.3
  silkscreen extent -2.25,-2.4 2.25,2.4, body extent -1.75,-1.88 1.75,1.88, height 0.8
SOT323 [mm]
  rect 0.75x0.5 smd: 1(-1.1,0.65) 2(-1.1,-0.65) 3(1.1,0)
  silkscreen extent -1.7,-1.25 1.7,1.25, body extent -1.05,-1 1.05,1, height 1
SOT-23 [mm]
  rect 1.05x0.55 smd: 1(-1.3,0.95) 2(-1.3,0) 3(-1.3,-0.95) 4(1.3,-0.95) 5(1.3,0) 6(1.3,0.95)
  silkscreen extent -2.25,-1.75 2.25,1.75, body extent -1.4,-1.45 1.4,1.45, height 1